# Altium PCB Power_vac.PcbDoc (part 5 of 5)
Units mm, origin at the board's own origin, x right, y up, seen from the top; angles counter-clockwise.
Board outline 180 x 212 mm, 4 copper layers (Top Layer, Int1 (GND), Int2 (PWR), Bottom Layer), stack 2.01 mm thick; 296 components, 149 nets, 798 pads, 522 vias.
Unrouted connection lines stored in the file: 1.
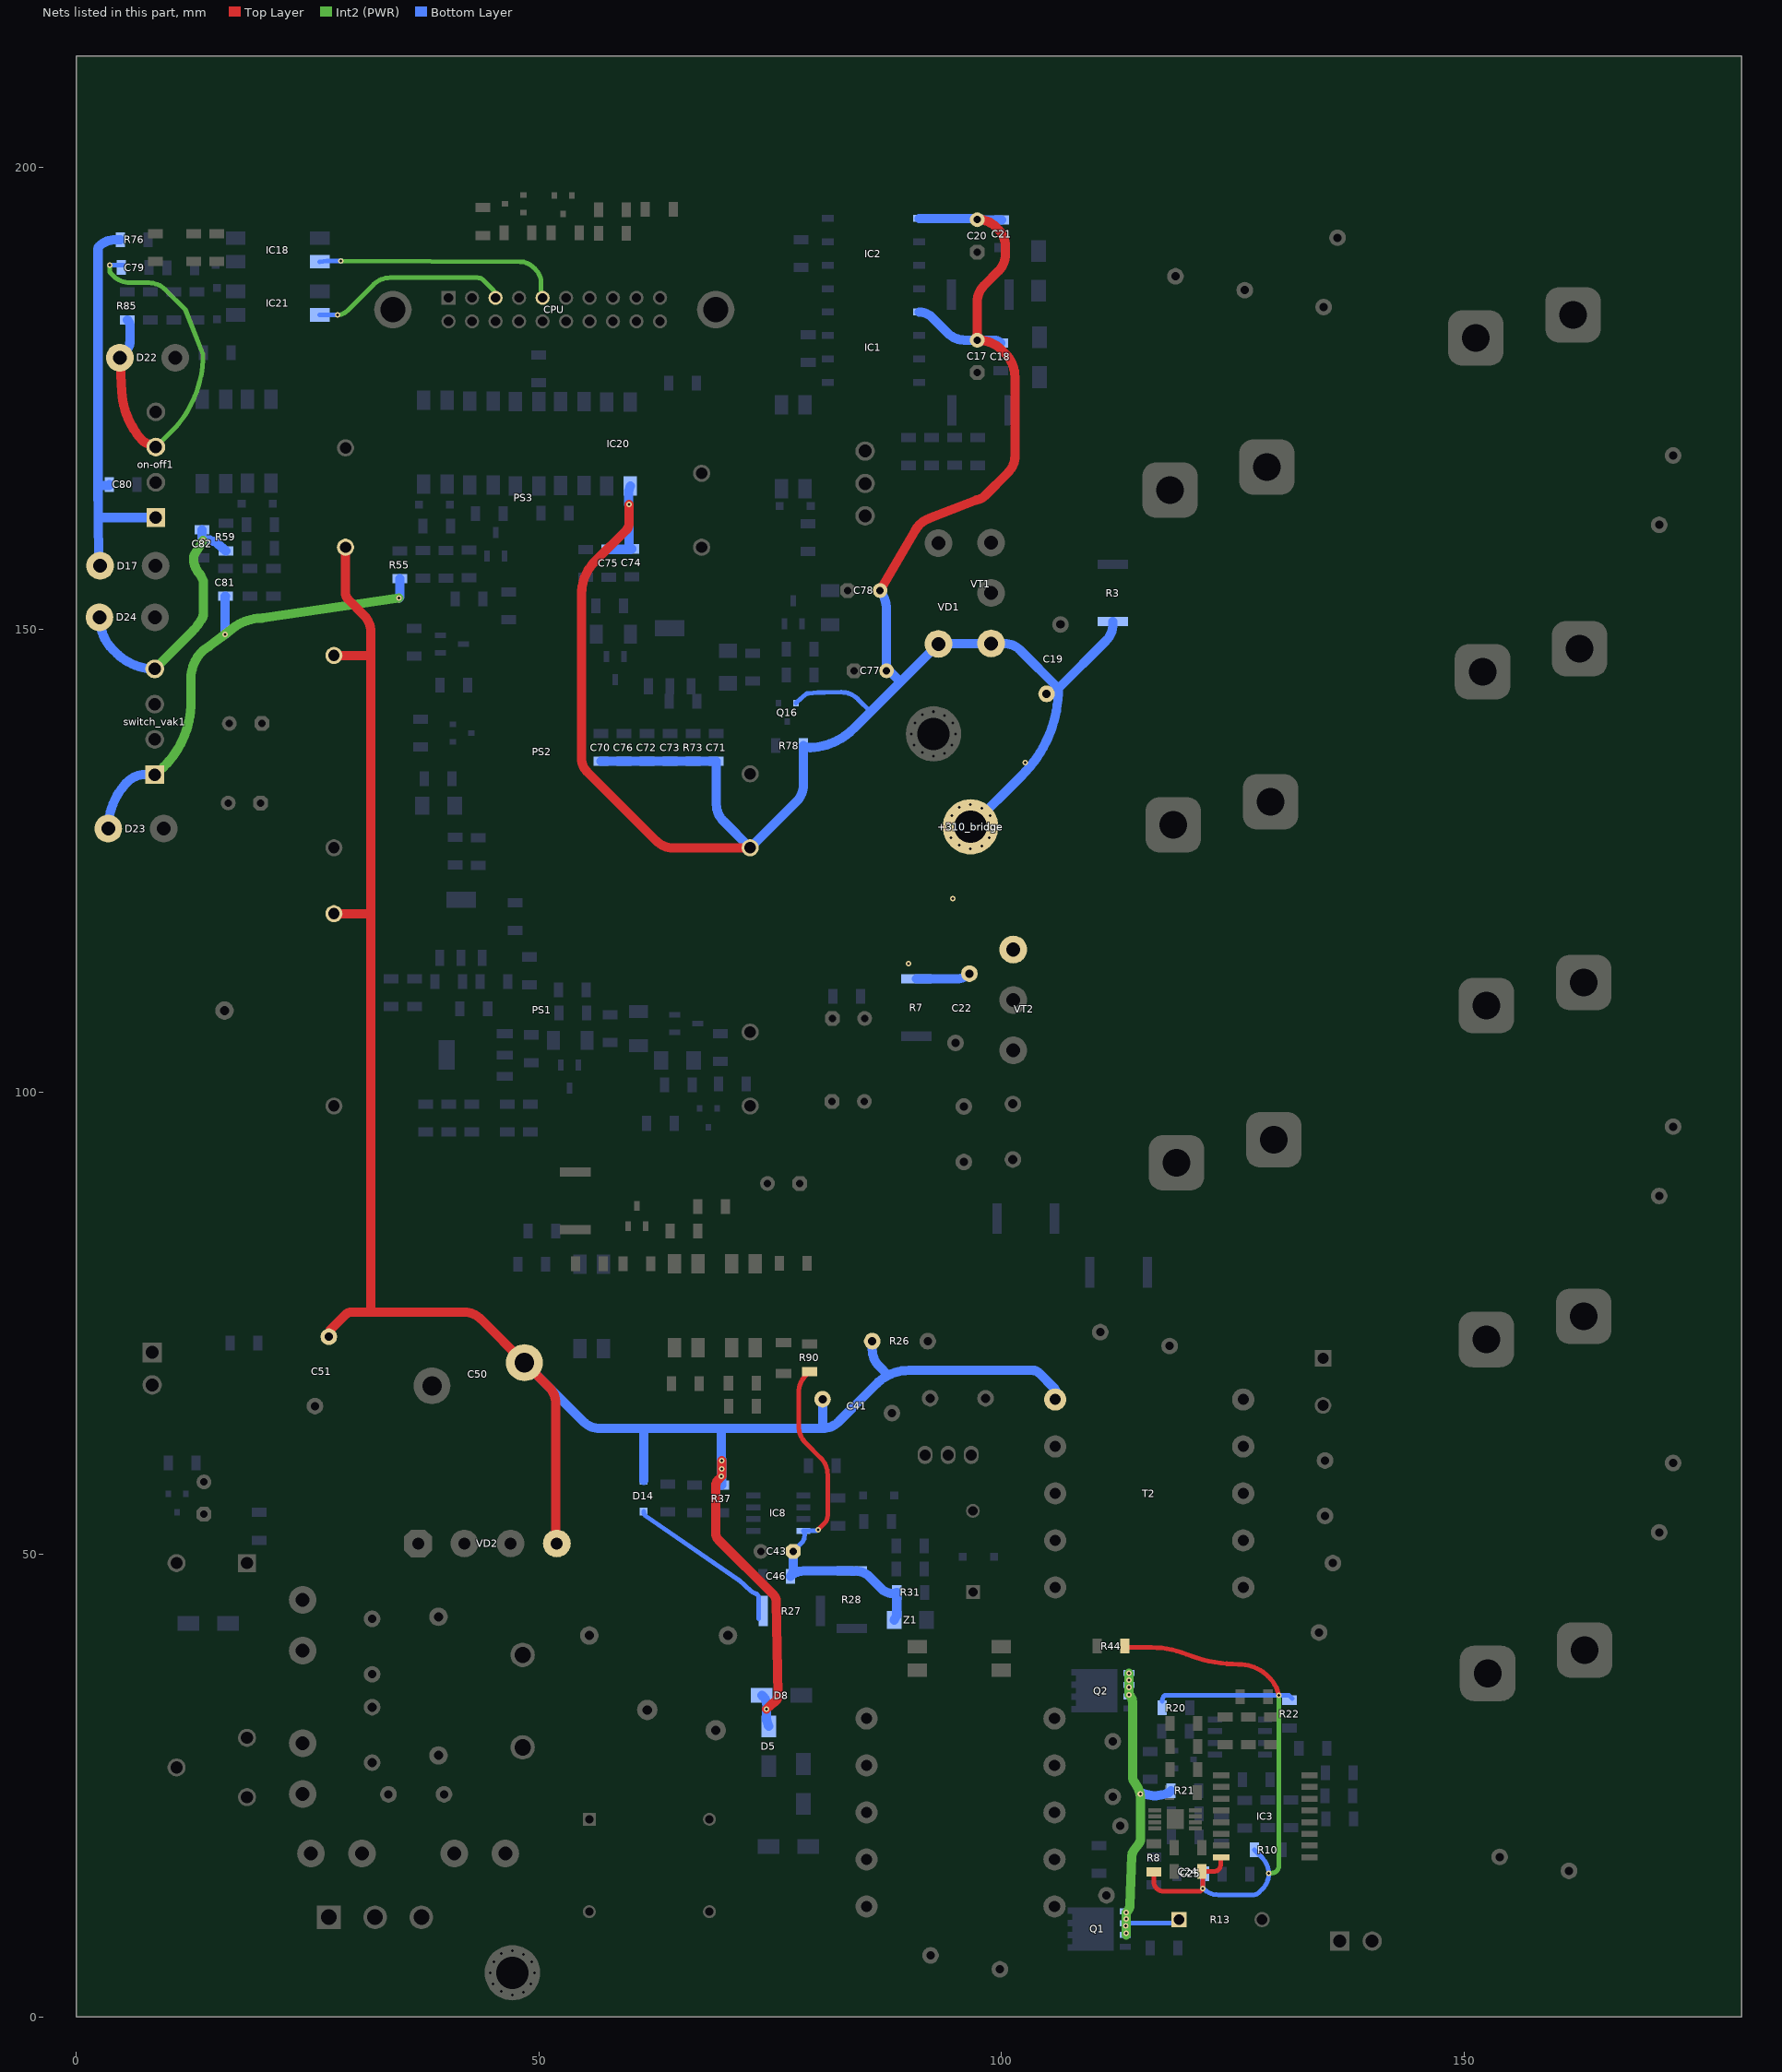
[diagram p6: the nets of this part, all layers, seen from the top]

## Via types
v1: diameter 0.6/0.6/0.6/0.6 (per signal layer), hole 0.3, Top Layer to Bottom Layer, tented both sides, 277 vias
v2: diameter 0.6, hole 0.3, Top Layer to Bottom Layer, tented both sides, 239 vias
v3: diameter 1.27, hole 0.711, Top Layer to Bottom Layer, 6 vias

## Nets (pads, with @x,y where several pads share a name; then routed paths per layer and width w, separated by ;. In a path a pad name is that pad's centre, name@x,y a point inside that pad or via, vN(x,y) a via of type N, cw(c..) or ccw(c..) an arc to the next point about the centre after c; other vN are vias at no path point) (continued)
Out_310_to_bridge: +310_bridge.1 C17.2 C18.1 C19.1 C20.2 C21.1 C22.1 C70.1 C71.1 C72.1 C73.1 C74.1 C75.1 C76.1 C77.2 C78.2 IC1.5 IC2.5 IC20.3 PS2.3 Q16.2 R3.1 R7.1 R73.1 R78.1 VD1.2 VT1.3 VT2.3 | length 257
  Top Layer w1: v2(59.75,163.55) 59.75,161.535 cw(c58.64,161.535) 59.425,160.75 56.122,157.447 cw(c55.417,158.156) 56.112,157.438 ccw(c59.517,153.902) 54.626,154.317 cw(c53.629,154.402) 54.614,154.229 ccw(c55.6,154.06) 54.6,154.062 54.6,154.06 54.6,136.065 ccw(c56.628,136.065) 55.194,134.631 62.681,127.144 ccw(c64.477,128.94) 64.477,126.4 PS2.3@72.825,126.4 ; C78.2@86.875,154.225 90.715,160.789 cw(c93.175,159.35) 92.14,162.006 97.224,163.987 cw(c97.587,163.055) 97.385,164.034 ccw(c97.067,165.596) 97.389,164.035 ccw(c97.067,165.596) 98.194,164.469 100.706,166.981 ccw(c98.91,168.777) 101.45,168.777 101.45,177.321 101.45,177.324 ccw(c97.884,177.323) 100.406,179.844 99.968,180.282 ccw(c97.509,177.823) 97.399,181.299 cw(c97.369,182.299) C17.2@97.375,181.3 ; C17.2@97.375,181.3 97.375,185.423 cw(c99.915,185.423) 98.119,187.219 99.681,188.781 ccw(c97.885,190.577) 100.425,190.577 100.425,191.448 ccw(c97.885,191.448) 99.681,193.244 99.344,193.581 ccw(c97.548,191.785) 97.548,194.325 C20.2@97.375,194.325
  Bottom Layer w0.5: Q16.2@77.8,142.05 77.85,142.15 78.875,143.025 78.93,143.052 cw(c79.153,142.605) 79.107,143.103 80.127,143.198 cw(c80.174,142.7) 80.174,143.2 80.225,143.2 ccw(c80.225,144.3) 80.237,143.2 ccw(c80.225,144.3) 80.24,143.2 80.86,143.208 82.667,143.23 cw(c82.671,142.73) 82.672,143.23 cw(c82.668,140.69) 84.464,142.486 85.837,141.113 ; C20.2@97.375,194.325 C20.2@97.388,194.313 ; C21.1@100.012,194.313 C21.1@100.025,194.3
  Bottom Layer w1: C70.1@56.675,135.75 C76.1@59.175,135.75 C72.1@61.676,135.75 C73.1@64.176,135.75 R73.1@66.676,135.75 C71.1@69.176,135.75 69.176,131.101 ccw(c71.716,131.101) 69.92,129.305 PS2.3@72.825,126.4 77.831,131.406 ccw(c76.035,133.202) 78.575,133.202 R78.1@78.575,137.45 78.908,137.312 ccw(c79.289,138.237) 79.319,137.237 ccw(c79.097,144.14) 83.983,139.258 85.837,141.113 89.012,144.288 ; C75.1@57.525,158.675 59.904,158.675 ccw(c59.904,158.846) C74.1@60.025,158.725 ; v2@59.7,163.55 59.7,164.975 IC20.3@59.871,165.525 ; C74.1@59.75,158.889 v2(59.75,163.55) ; C78.2@86.875,154.225 86.878,154.222 cw(c84.075,152.125) 87.575,152.133 C77.2@87.575,145.825 ; C77.2@87.575,145.55 C77.2@87.575,145.825 ; R7.1@90.8,112.225 91.95,112.225 95.137,112.225 ccw(c95.137,114.188) C22.1@96.525,112.8 ccw(c96.223,113.102) C22.1@96.65,113.102 ; IC1.5@91.1,184.335 cw(c91.1,182.367) 92.491,183.759 94.206,182.044 ccw(c96.002,183.84) 96.002,181.3 C17.2@97.375,181.3 99.186,181.3 cw(c99.186,180.3) 99.895,181.005 C18.1@99.9,181 ; IC2.5@91.1,194.46 97.049,194.46 cw(c97.049,193.999) C20.2@97.375,194.325 ; +310_bridge.1@96.65,128.675 102.278,134.303 ccw(c92.932,143.65) 106.15,143.65 ; C20.2@97.388,194.313 C21.1@100.012,194.313 ; R3.1@112.05,150.85 112.05,150.602 cw(c109.51,150.602) 111.306,148.806 106.15,143.65 ; C77.2@87.575,145.825 88.942,144.458 cw(c88.771,144.288) 89.012,144.288 ; 89.012,144.288 VD1.2@93.175,148.45 cw(c93.295,148.329) 93.295,148.5 VT1.3@98.875,148.5 100.248,148.5 cw(c100.248,145.96) 102.044,147.756 106.15,143.65
  other v2: 89.925,113.9 94.75,120.9 102.575,135.6
power_6565: D14.1 R27.1 | length 18
  Bottom Layer w0.5: D14.1@61.325,54.625 61.338,54.45 ccw(c61.825,54.564) 61.54,54.154 71.556,47.239 cw(c71.272,46.827) 71.605,47.2 72.942,46.005 ccw(c73.675,46.825) 73.384,45.764 cw(c73.25,45.282) 73.75,45.283 73.75,44.45 R27.1@73.75,43.05
Power_trans: C41.1 C50.1 C51.1 D5.1 D8.1 D14.2 PS1.1 PS2.1 PS3.1 R26.2 R37.1 T2.1 VD2.3 | length 254.7
  Top Layer w1: C51.1@27.275,73.525 cw(c28.26,73.696) 27.551,74.401 29.033,75.883 cw(c29.739,75.175) 29.139,75.975 cw(c29.739,75.175) 29.739,76.175 31.8,76.175 ; PS1.1@27.825,119.275 31.559,119.275 ccw(c31.559,119.616) 31.8,119.375 ; PS2.1@27.825,147.2 31.74,147.2 ccw(c31.74,147.285) 31.8,147.225 ; PS3.1@29.075,158.9 29.075,153.962 ccw(c30.075,153.964) 29.366,153.259 29.368,153.257 31.074,151.551 cw(c29.32,149.798) 31.075,151.55 cw(c29.32,149.798) 31.8,149.798 31.8,147.225 ; VD2.3@51.825,51.175 51.825,66.273 ccw(c49.285,66.273) 51.081,68.069 C50.1@48.425,70.725 43.719,75.431 ccw(c41.923,73.635) 41.923,76.175 31.8,76.175 ; v2(69.725,58.425) 69.392,58.092 ccw(c70.1,57.386) 69.1,57.386 69.1,52.286 ccw(c70.1,52.289) 69.391,51.584 75.358,45.617 75.359,45.616 cw(c74.651,44.91) 75.65,44.929 75.842,34.808 cw(c74.842,34.792) 75.329,33.919 ccw(c75.857,32.964) 75.085,33.735 v2(74.6,33.25) ; v2@69.775,58.425 v2(69.775,60.15) ; 31.8,76.175 31.8,119.375 ; 31.8,119.375 31.8,147.225
  Bottom Layer w1: C50.1@48.425,70.725 54.806,64.344 ccw(c56.602,66.14) 56.602,63.6 61.25,63.6 ; D14.2@61.325,57.975 61.325,63.419 ccw(c61.069,63.419) 61.25,63.6 ; R37.1@69.75,57.5 69.75,58.425 v2(69.75,59.225) v2@69.75,60.15 ; v2(69.775,60.15) cw(c70.691,60.552) 69.691,60.549 69.691,63.6 ; D8.1@74.075,34.75 74.411,34.45 74.601,33.909 cw(c73.656,33.58) v2(74.6,33.25) 74.6,32.075 D5.1@74.825,31.4 ; C41.1@80.65,66.775 80.65,63.726 cw(c80.472,63.726) 80.598,63.6 ; R26.2@86.025,73.05 86.025,72.144 ccw(c88.565,72.144) 86.769,70.348 87.758,69.36 ; T2.1@105.93,66.742 105.93,67.331 ccw(c104.93,67.331) 105.637,68.038 104.078,69.597 ccw(c103.371,68.89) 103.971,69.69 ccw(c103.371,68.89) 103.371,69.89 89.982,69.89 ccw(c89.982,64.96) 87.758,69.36 ; 61.25,63.6 61.325,63.6 69.691,63.6 ; 69.691,63.6 80.598,63.6 ; 80.598,63.6 ccw(c80.598,66.14) 82.394,64.344 85.457,67.407 86.496,68.446 cw(c89.982,64.96) 87.758,69.36
Rele_off_connect: C80.2 D17.2 on-off1.1 R76.1 | length 44.7
  Bottom Layer w1: 2.319,165.621 2.354,162.112 2.355,161.995 2.356,161.974 ; D17.2@2.55,156.9 ccw(c1.561,157.045) 2.561,157.045 ccw(c1.561,157.045) 2.482,157.434 2.476,157.448 cw(c3.398,157.836) 2.398,157.825 2.356,161.974 ; C80.2@3.525,165.7 3.525,165.601 2.319,165.601 2.319,191.169 cw(c2.681,191.169) 2.425,191.425 2.431,191.431 cw(c4.227,189.635) 4.227,192.175 R76.1@4.75,192.175 ; on-off1.1@8.575,162.115 2.695,162.115 ccw(c2.695,161.635) 2.356,161.974
Rele_on_connect: C79.2 D22.2 on-off1.3 R85.1 | length 44.4
  Top Layer w1: D22.2@4.675,179.4 4.892,175.712 ccw(c13.413,176.214) 7.117,170.451 ccw(c7.852,171.129) 7.479,170.201 8.568,169.76 cw(c8.19,168.833) on-off1.3@8.582,169.753
  Int2 (PWR) w0.5: v2(3.6,189.4) 3.6,188.766 ccw(c3.941,188.766) 3.7,188.525 3.981,188.244 ccw(c5.777,190.04) 5.777,187.5 7.806,187.5 cw(c7.806,184.96) 9.602,186.756 11.761,184.597 13.64,179.839 cw(c13.175,179.654) 13.675,179.654 cw(c1.734,179.746) 10.708,171.868 10.697,171.857 on-off1.3@8.575,169.735
  Bottom Layer w0.5: v2(3.6,189.4) C79.2@5.05,189.4
  Bottom Layer w1: D22.2@4.675,179.4 5.281,180.006 ccw(c4.089,181.199) 5.775,181.199 5.775,182.786 ccw(c4.775,182.786) 5.48,183.495 R85.1@5.475,183.5
switch__vak_2: C82.1 D24.2 R59.1 switch_vak1.4 | length 29.3
  Int2 (PWR) w1: switch_vak1.4@8.45,145.745 12.611,149.906 ccw(c9.314,153.207) 13.401,150.957 ccw(c12.679,151.679) 13.7,151.679 13.7,155.25 13.461,155.781 ccw(c12.549,155.37) 13.296,156.034 cw(c15.19,157.727) 12.652,157.632 cw(c15.19,157.727) 12.652,157.636 cw(c13.651,157.669) 12.798,158.192 v2(13.676,159.625)
  Bottom Layer w1: D24.2@2.575,151.05 ccw(c7.102,151.05) 3.901,147.849 3.903,147.847 4.279,147.471 ccw(c8.45,151.648) switch_vak1.4@8.45,145.745 ; C82.1@13.575,160.775 13.575,159.869 ccw(c13.92,159.869) v2(13.676,159.625) 13.727,159.646 cw(c14.108,158.722) 14.393,159.68 14.396,159.679 14.763,159.568 cw(c14.375,158.275) 15.275,159.281 16.149,158.5 R59.1@16.152,158.5
switch_vak_1: C81.2 D23.2 R55.1 switch_vak1.1 | length 52.4
  Int2 (PWR) w1: switch_vak1.1@8.45,134.315 8.962,134.731 ccw(c2.451,142.22) 12.375,142.202 12.375,142.205 12.375,144.719 12.375,144.722 cw(c16.534,144.72) 13.621,147.688 cw(c16.534,144.72) 13.631,147.697 13.639,147.705 cw(c14.321,146.974) 13.76,147.802 14.328,148.185 ccw(c13.767,149.013) 14.369,148.214 v2(16.075,149.5) 17.136,150.321 ccw(c16.524,151.112) 17.138,150.323 cw(c17.752,149.533) 17.197,150.365 cw(c20.045,146.078) 17.199,150.367 cw(c20.045,146.078) 19.918,151.223 cw(c20.045,146.078) 19.921,151.224 ccw(c19.894,152.223) 20.125,151.25 ccw(c19.894,152.223) 20.126,151.25 cw(c20.355,150.277) 20.209,151.266 v2(34.85,153.4)
  Bottom Layer w1: D23.2@3.425,128.475 cw(c10.607,128.475) 5.436,133.459 cw(c10.607,128.475) 5.528,133.553 cw(c7.37,131.708) 7.37,134.315 switch_vak1.1@8.45,134.315 ; v2(16.075,149.5) 16.075,153.6 C81.2@16.1,153.6 ; v2(34.85,153.4) ccw(c34.609,153.641) 34.95,153.641 R55.1@34.95,155.496
U_shunt: Q1.1 Q1.2 Q1.3 Q2.1 Q2.2 Q2.3 R13.1 R21.1 | length 43.6
  Int2 (PWR) w1: v2@113.5,8.837 v2(113.5,9.025) 113.491,9.802 113.483,10.556 v2(113.475,11.275) 113.576,11.369 ccw(c112.895,12.101) 113.895,12.064 114.094,17.398 cw(c115.094,17.358) 114.294,17.958 114.826,18.668 ccw(c114.025,19.267) 115.025,19.267 115.025,23.523 ccw(c112.158,23.523) 114.401,25.308 ccw(c112.158,23.523) 114.4,25.31 cw(c115.184,25.931) 114.184,25.925 114.157,34.033 ccw(c113.157,34.03) 113.861,34.739 v2(113.775,34.825) v2(113.775,35.625) v2(113.775,36.4) v2(113.775,37.155)
  Bottom Layer w0.35: Q1.3@113.375,8.84 v2(113.5,9.025) ; Q1.3@113.375,9.056 v2(113.5,9.025) ; v2(113.475,11.275) Q1.1@113.375,11.38 113.375,10.55 Q1.2@113.375,10.11 ; Q1.2@113.8,10.11 Q1.2@113.375,10.11 ; Q1.2@113.375,10.11 113.417,9.96 113.417,9.762 ccw(c113.767,9.762) 113.419,9.725 113.484,9.098 ccw(c113.833,9.134) v2(113.5,9.025)
  Bottom Layer w0.5: v2(113.775,34.825) v2(113.775,35.625) v2(113.775,37.155) ; Q1.2@113.8,10.11 118.376,10.11 ccw(c118.376,10.46) 118.503,10.134 118.524,10.142 R13.1@119.175,10.5
  Bottom Layer w1: v2(115,24.075) cw(c115.288,23.117) 115.637,24.054 ccw(c116.584,26.574) 117.26,23.969 117.801,24.11 ccw(c117.546,25.077) R21.1@118.325,24.45
  other v2: 113.45,9.8 113.475,10.55
Vac_off: CPU.9 IC18.4 | length 26.6
  Int2 (PWR) w0.5: v2@28.715,189.874 47.945,189.776 cw(c47.984,187.923) 49.267,189.26 ; 49.324,189.213 cw(c48.099,187.475) 50.22,187.625 CPU.9@50.22,186.262
  Bottom Layer w0.5: IC18.4@26.3,189.78 27.1,189.875 v2(28.55,189.875) ; CPU.9@50.22,186.262 ccw(c50.767,186.262) CPU.9@50.38,185.875
Vac_on: CPU.5 IC21.4 | length 21.6
  Int2 (PWR) w0.5: v2@28.232,184.03 ccw(c28.195,185.563) 29.279,184.479 32.106,187.306 cw(c33.902,185.51) 33.902,188.05 43.336,188.05 cw(c43.336,187.111) 44,187.775 44.876,186.899 cw(c43.851,185.875) CPU.5@45.3,185.875
  Bottom Layer w0.5: IC21.4@26.3,184.03 28.195,184.03 28.197,184.028 cw(c28.242,183.531) v2@28.232,184.03
  other v2: 28.2,184.025
vcc_6565: C43.1 C46.2 IC8.8 R28.2 R31.1 R90.2 Z1.1 | length 41.6
  Top Layer w0.5: R90.2@79.25,69.75 78.819,69.319 ccw(c80.615,67.523) 78.075,67.523 78.075,63.852 ccw(c80.615,63.852) 78.819,62.056 80.456,60.419 cw(c78.66,58.623) 81.2,58.623 81.2,54.175 cw(c80.053,54.175) 80.864,53.364 v2(80.175,52.675)
  Bottom Layer w0.5: C43.1@77.475,50.325 78.425,51.275 ccw(c77.794,51.906) 78.681,51.815 78.71,52.097 ccw(c78.213,52.148) 78.673,52.344 78.619,52.47 IC8.8@78.587,52.545 79.861,52.545 ccw(c79.861,52.989) v2(80.175,52.675)
  Bottom Layer w1: C43.1@77.475,50.325 77.475,48.349 cw(c76.451,48.349) C46.2@77.175,47.625 cw(c78.563,46.237) 78.563,48.2 R28.2@83.825,48.2 ; R28.2@83.834,48.153 cw(c84.238,46.092) 85.723,47.577 87.002,46.298 ccw(c88.351,47.651) 88.011,45.771 ccw(c88.187,46.755) 88.57,45.832 R31.1@88.675,45.875 88.675,43.38 Z1.1@88.4,42.9
Vref: C24.2 C25.1 IC3.16 R8.2 R10.1 R20.2 R22.1 R44.2 | length 78.7
  Top Layer w0.5: R44.2@113.35,40.125 113.6,39.925 116.238,39.925 cw(c116.24,29.897) 119.957,39.211 ccw(c125.686,53.545) 125.619,38.108 ccw(c125.686,53.545) 125.62,38.108 cw(c125.626,33.539) 129.472,36.006 129.688,35.67 cw(c129.311,35.425) 129.742,35.554 v2(129.975,34.775) ; R8.2@116.475,15.675 116.475,14.6 ccw(c117.525,14.6) 117.525,13.55 121.313,13.55 121.314,13.55 ccw(c121.313,14.05) v2(121.778,13.868) 121.778,15.597 ccw(c121.675,15.597) C24.2@121.675,15.7 122.95,15.7 ccw(c122.95,16.45) 123.7,16.45 123.7,17.155 IC3.16@123.75,17.23
  Int2 (PWR) w0.5: v2(128.9,15.525) 129.2,15.525 ccw(c129.2,16.3) 129.975,16.3 v2(129.975,34.775)
  Bottom Layer w0.5: R20.2@117.375,34.125 cw(c118.28,34.125) 117.508,34.598 cw(c118.28,34.125) 117.509,34.6 cw(c117.807,34.415) 117.806,34.765 131.068,34.765 R22.1@131.45,34.383 ; C25.1@121.95,15.475 121.778,14.925 121.778,14.09 ccw(c122.278,14.09) 121.962,13.703 ccw(c123.452,15.542) 123.452,13.175 123.454,13.175 127.151,13.175 ccw(c127.151,14.199) 127.875,13.475 128.221,13.821 ccw(c126.642,15.4) v2@128.875,15.4 ; R10.1@127.325,18.05 128.131,17.244 cw(c126.335,15.448) v2@128.875,15.448
pads on no net: Ban. IC1.1 IC1.4 IC2.1 IC2.4 IC3.4 IC5.7 K1.5 T1.8 T2.8 VD1. VT1. VT2.

## Polygon pours and split planes (outlines as drawn)
310v on Bottom Layer "NONET_L01_P-001" (solid, pour order 108): 21 vertices, not listed, extent 115.075,78.425 130.775,88.475
Out_310_to_bridge on Bottom Layer "NONET_L01_P-001" (solid, pour order 107): 22 vertices, not listed, extent 106.475,141.72 114.575,151.75
NetC19_2 on Bottom Layer "NONET_L01_P-001" (solid, pour order 106): 49 vertices, not listed, extent 96.85,149.525 114.8,175.675
NetR46_2 on Bottom Layer "NONET_L01_P-001" (solid, pour order 105): 34 vertices, not listed, extent 40.2,31.475 64.025,57.95
NetD10_1 on Bottom Layer "NONET_L01_P-001" (solid, pour order 95): 37 vertices, not listed, extent 93.45,59.925 107.575,67.85
NetD3_1 on Bottom Layer "NONET_L01_P-001" (solid, pour order 93): 94.675,93.55 cw(c95.701,92.524) 95.701,93.975 100.52,93.975 cw(c100.52,91.67) 102.15,93.3 cw(c101.788,92.938) 102.3,92.938 102.3,92.05 cw(c101.817,92.05) 102.159,91.709 101.7,91.25 cw(c100.372,92.578) 100.372,90.7 95.725,90.7 cw(c95.725,91.847) 94.914,91.036 94.475,91.475 cw(c94.596,91.596) 94.425,91.596 94.425,92.85
NetD3_2 on Bottom Layer "NONET_L01_P-001" (solid, pour order 91): 30 vertices, not listed, extent 99.225,97.675 107.575,112
Out_310_to_bridge on Bottom Layer "NONET_L01_P-001" (solid, pour order 88): 35 vertices, not listed, extent 88.425,110.925 104.375,132.425
Out_310_to_bridge on Bottom Layer "NONET_L01_P-001" (solid, pour order 87): 35 vertices, not listed, extent 91,124.875 107.775,150.825
NetD13_2 on Bottom Layer "NONET_L01_P-001" (solid, pour order 84): 29.75,27.295 29.75,27.645 cw(c30.925,27.645) 30.925,28.82 32.785,28.82 cw(c32.785,26.28) 35.325,26.28 35.325,23.17 cw(c34.375,23.17) 34.375,22.22 31.525,22.22 cw(c31.525,23.745) 30,23.745
NetC49_1 on Bottom Layer "NONET_L01_P-001" (solid, pour order 81): 19 vertices, not listed, extent 67.038,20.438 71.688,42.513
NetD7_1 on Bottom Layer "NONET_L01_P-001" (solid, pour order 77): 77.2,35.525 cw(c77.6,35.525) 77.6,35.925 85.875,35.925 cw(c85.875,34.2) 87.6,34.2 87.6,26.475 cw(c86.075,26.675) 85.875,25.15 78.225,25.15 cw(c78.177,26.127) 77.2,26.075
NetD5_2 on Bottom Layer "NONET_L01_P-001" (solid, pour order 76): 83.075,17.3 cw(c84.6,17.3) 84.6,18.825 86.875,18.825 cw(c86.875,18.8) 86.9,18.8 cw(c86.9,17.85) 87.85,17.85 87.85,11.05 cw(c87.8,11.05) 87.8,11 cw(c86.775,11) 86.775,9.975 84.975,9.975 cw(c84.975,11.875) 83.075,11.875
GND_akum on Bottom Layer "NONET_L01_P-001" (solid, pour order 75): 25 vertices, not listed, extent 98.555,2.846 138.78,37.571
NetD9_2 on Bottom Layer "NONET_L01_P-001" (solid, pour order 73): 18 vertices, not listed, extent 123.675,57.925 136.625,68.175
GND_digit on Bottom Layer "NONET_L01_P-001" (solid, pour order 65): 46 vertices, not listed, extent 15.65,173.29 82.4,208.415
NetFU2_1 on Bottom Layer "NONET_L01_P-001" (solid, pour order 60): 22 vertices, not listed, extent 17.124,22.083 27.124,32.133
GND_N on Bottom Layer "NONET_L01_P-001" (solid, pour order 59): 35.107,50.18 35.107,67.496 cw(c37.241,67.496) 35.732,69.005 36.663,69.936 cw(c38.459,68.14) 38.459,70.68 39.318,70.68 cw(c39.319,68.717) 40.707,70.105 cw(c39.439,68.838) 41.232,68.838 41.232,67.182 cw(c38.692,67.182) 40.488,65.386 39.651,64.549 ccw(c41.447,62.753) 38.907,62.753 38.907,50.34 cw(c36.99,50.664)
220_L on Bottom Layer "NONET_L01_P-001" (solid, pour order 58): 40 vertices, not listed, extent 8.85,9.25 32.5,28.8
220_L_Fuse on Bottom Layer "NONET_L01_P-001" (solid, pour order 57): 19 vertices, not listed, extent 38.238,15.8 56.363,32
220_N on Bottom Layer "NONET_L01_P-001" (solid, pour order 53): 37 vertices, not listed, extent 31.056,9.069 63.581,44.894
GND_force on Bottom Layer "NONET_L01_P-001" (solid, pour order 38): 17 vertices, not listed, extent 114.375,160.85 121.1,173.35
GND_force on Bottom Layer "NONET_L01_P-001" (solid, pour order 37): 22 vertices, not listed, extent 113.15,87.8 122.3,132.875
GND_force on Bottom Layer "NONET_L01_P-001" (solid, pour order 35): 35 vertices, not listed, extent 158.525,32.575 176.325,189.425
310v on Bottom Layer "Bottom Layer-310v" (solid, pour order 34): 43 vertices, not listed, extent 123.673,33.001 155.873,189.251
NetC93_2 on Bottom Layer "NONET_L01_P-001" (solid, pour order 18): 18 vertices, not listed, extent 133.65,47.35 137.525,55.25
GND_force on Bottom Layer "NONET_L01_P-001" (solid, pour order 17): 124.275,48.595 124.275,51.266 cw(c125.663,51.266) 124.682,52.248 124.842,52.408 cw(c126.25,50.999) 126.25,52.991 127.04,52.991 cw(c127.04,51.882) 127.825,52.666 cw(c126.316,51.157) 128.45,51.157 128.45,46.95 cw(c126.316,46.95) 127.825,45.441 127.794,45.41 cw(c125.998,47.206) 125.998,44.666 125.7,44.666 124.466,45.9 cw(c124.808,46.241) 124.325,46.241
U_shunt on Bottom Layer "NONET_L01_P-001" (solid, pour order 15): 113.05,37.4 cw(c113.231,37.4) 113.103,37.528 113.25,37.675 cw(c113.371,37.554) 113.371,37.725 114.204,37.725 cw(c114.204,37.554) 114.325,37.675 114.362,37.638 cw(c114.148,37.425) 114.45,37.425 114.45,34.371 cw(c114.279,34.371) 114.4,34.25 cw(c114.159,34.491) 114.159,34.15 113.618,34.15 cw(c113.618,34.918) 113.075,34.375
NetC40_2 on Bottom Layer "NONET_L01_P-001" (solid, pour order 14): 110.875,24.1 cw(c111.72,24.1) 111.122,24.697 111.175,24.75 cw(c111.899,24.026) 111.899,25.05 112.334,25.05 cw(c112.334,23.684) 113.3,24.65 cw(c111.791,23.141) 113.925,23.141 113.925,20.51 cw(c112.815,20.51) 113.6,19.725 cw(c112.634,20.691) 112.634,19.325 112.625,19.325 cw(c112.625,20.834) 111.558,19.767 111.45,19.875 cw(c112.959,21.384) 110.825,21.384 110.825,22.95
12v_akum on Bottom Layer "NONET_L01_P-001" (solid, pour order 13): 18 vertices, not listed, extent 104.15,15.45 107.3,28.525
U_shunt on Bottom Layer "NONET_L01_P-001" (solid, pour order 12): 32 vertices, not listed, extent 112.72,8.306 120.195,11.863
Drain_1 on Bottom Layer "NONET_L01_P-001" (solid, pour order 11): 29 vertices, not listed, extent 104.4,7.025 112.375,14.075
NetQ2_4 on Bottom Layer "NONET_L01_P-001" (solid, pour order 8): 23 vertices, not listed, extent 113.2,28.575 117.15,35
Drain_2 on Bottom Layer "NONET_L01_P-001" (solid, pour order 6): 32 vertices, not listed, extent 104.425,28.75 113.175,37.775
GND_akum on Int1 (GND) "NONET_L01_P-001" (solid, pour order 62): 22 vertices, not listed, extent 98.425,2.8 142.375,39.241
GND_N on Int1 (GND) "Int1 (GND)-GND_N" (solid, pour order 49): 52 vertices, not listed, extent 21.775,4.254 113.964,75.338
GND_force on Int1 (GND) "Int1 (GND)-GND_force" (solid, pour order 30): 59 vertices, not listed, extent 34.663,12.713 176.463,200.138
GND_force on Int1 (GND) "NONET_L01_P-001" (solid, pour order 19): 64 vertices, not listed, extent 5.25,40.775 24.85,199.7
310v on Top Layer "310V_L01_P115" (solid, remove dead copper, pour order 115): 159.178,169.867 158.33,169.867 cw(c158.33,172.407) 156.534,170.611 154.303,172.842 153.771,172.311 ccw(c155.567,170.515) 153.028,170.515 153.028,167.744 ccw(c156.299,167.52) 154.299,164.921 cw(c157.142,164.716) 157.142,167.567 159.153,167.567
310v on Top Layer "310V_L01_P114" (solid, remove dead copper, pour order 114): 159.928,97.342 159.08,97.342 cw(c159.08,99.882) 157.284,98.086 155.053,100.317 154.521,99.786 ccw(c156.317,97.99) 153.778,97.99 153.778,95.219 ccw(c157.049,94.995) 155.049,92.396 cw(c157.892,92.191) 157.892,95.042 159.903,95.042
310v on Top Layer "310V_L01_P113" (solid, remove dead copper, pour order 113): 159.799,60.9 158.951,60.9 cw(c158.951,63.44) 157.155,61.644 154.924,63.875 154.393,63.344 ccw(c156.189,61.548) 153.649,61.548 153.649,58.777 ccw(c156.921,58.553) 154.92,55.955 cw(c157.763,55.75) 157.763,58.6 159.774,58.6
Fod_3184_18v on Top Layer "FOD_3184_18V_L01_P112" (solid, remove dead copper, pour order 112): 19 vertices, not listed, extent 75.25,80.3 80.125,91.45
Eth on Top Layer "NONET_L01_P-001" (solid, pour order 110): 33 vertices, not listed, extent 30.773,0.85 50.898,12.05
310v on Top Layer "NONET_L01_P-001" (solid, pour order 109): 23 vertices, not listed, extent 133.375,68.325 142.8,76.85
NetC49_2 on Top Layer "NONET_L01_P-001" (solid, pour order 104): 36 vertices, not listed, extent 44.848,9.8 70.625,53.175
GND_akum on Top Layer "Top Layer-GND_akum" (solid, remove dead copper, pour order 99): 34 vertices, not listed, extent 98.425,2.825 142.95,37.55
NetD3_2 on Top Layer "NONET_L01_P-001" (solid, pour order 92): 30 vertices, not listed, extent 99.325,97.7 107.675,112.025
Out_310_to_bridge on Top Layer "NONET_L01_P-001" (solid, pour order 90): 35 vertices, not listed, extent 90.971,124.96 107.746,150.91
Out_310_to_bridge on Top Layer "NONET_L01_P-001" (solid, pour order 89): 35 vertices, not listed, extent 88.326,110.959 104.276,132.459
310v on Top Layer "NONET_L01_P-001" (solid, pour order 86): 24 vertices, not listed, extent 97.125,152.175 129.2,159.6
NetC49_1 on Top Layer "NONET_L01_P-001" (solid, pour order 82): 19 vertices, not listed, extent 67.054,20.471 71.704,42.546
12v_akum on Top Layer "NONET_L01_P-001" (solid, pour order 80): 18 vertices, not listed, extent 104.088,15.412 107.237,28.487
GND_digit on Top Layer "NONET_L01_P-001" (solid, pour order 66): 44 vertices, not listed, extent 15.736,173.275 82.486,208.4
GND_N on Top Layer "NONET_L01_P-001" (solid, pour order 44): 35.11,50.384 35.11,67.7 cw(c37.244,67.7) 35.735,69.209 36.666,70.14 cw(c38.462,68.344) 38.462,70.884 39.322,70.884 cw(c39.322,68.921) 40.71,70.309 cw(c39.443,69.041) 41.235,69.041 41.235,67.386 cw(c38.696,67.386) 40.491,65.59 39.654,64.753 ccw(c41.45,62.957) 38.91,62.957 38.91,50.543 cw(c36.993,50.867)
310v on Top Layer "Top Layer-310v" (solid, pour order 33): 43 vertices, not listed, extent 123.825,32.975 156.025,189.225
310v on Int2 (PWR) "NONET_L01_P-001" (solid, pour order 103): 24 vertices, not listed, extent 97.096,152.17 129.171,159.595
GND_force on Int2 (PWR) "NONET_L01_P-001" (solid, pour order 101): 124.225,48.6 124.225,51.271 cw(c125.613,51.271) 124.632,52.253 124.792,52.413 cw(c126.2,51.005) 126.2,52.996 126.99,52.996 cw(c126.99,51.887) 127.775,52.671 cw(c126.266,51.163) 128.4,51.163 128.4,46.955 cw(c126.266,46.955) 127.775,45.446 127.744,45.415 cw(c125.948,47.211) 125.948,44.671 125.65,44.671 124.416,45.905 cw(c124.758,46.246) 124.275,46.246
NetC93_2 on Int2 (PWR) "NONET_L01_P-001" (solid, pour order 100): 18 vertices, not listed, extent 133.6,47.386 137.475,55.286
NetD10_1 on Int2 (PWR) "NONET_L01_P-001" (solid, pour order 96): 37 vertices, not listed, extent 93.441,59.925 107.566,67.85
NetD9_2 on Int2 (PWR) "NONET_L01_P-001" (solid, pour order 94): 17 vertices, not listed, extent 123.634,57.941 136.584,68.191
NetD13_2 on Int2 (PWR) "NONET_L01_P-001" (solid, pour order 83): 29.7,27.35 29.7,27.7 cw(c30.875,27.7) 30.875,28.875 32.735,28.875 cw(c32.735,26.335) 35.275,26.335 35.275,23.225 cw(c34.325,23.225) 34.325,22.275 31.475,22.275 cw(c31.475,23.8) 29.95,23.8
NetD5_2 on Int2 (PWR) "NONET_L01_P-001" (solid, pour order 79): 83.075,17.325 cw(c84.6,17.325) 84.6,18.85 86.875,18.85 cw(c86.875,18.825) 86.9,18.825 cw(c86.9,17.875) 87.85,17.875 87.85,11.075 cw(c87.8,11.075) 87.8,11.025 cw(c86.775,11.025) 86.775,10 84.975,10 cw(c84.975,11.9) 83.075,11.9
NetD7_1 on Int2 (PWR) "NONET_L01_P-001" (solid, pour order 78): 77.225,35.512 cw(c77.625,35.512) 77.625,35.912 85.9,35.912 cw(c85.9,34.188) 87.625,34.187 87.625,26.462 cw(c86.1,26.662) 85.9,25.137 78.25,25.137 cw(c78.202,26.114) 77.225,26.062
NetFU2_1 on Int2 (PWR) "NONET_L01_P-001" (solid, pour order 56): 22 vertices, not listed, extent 17.05,22.075 27.05,32.125
220_L on Int2 (PWR) "NONET_L01_P-001" (solid, pour order 55): 40 vertices, not listed, extent 8.9,9.175 32.55,28.725
220_L_Fuse on Int2 (PWR) "NONET_L01_P-001" (solid, pour order 50): 19 vertices, not listed, extent 38.3,15.775 56.425,31.975
Eth on Int2 (PWR) "NONET_L01_P-001" (solid, pour order 45): 33 vertices, not listed, extent 30.775,1.075 50.9,12.275
GND_force on Int2 (PWR) "NONET_L01_P-001" (solid, pour order 36): 23 vertices, not listed, extent 14.901,73.3 44.375,93.725

## Keep-outs
Keep-Out Layer:
  circle w3: c109.875,186.5 r2
  circle w3: c141.703,56.881 r2
  circle w3: c109.825,111.725 r2
  circle w3: c171.953,128.35 r2
  circle w3: c98.578,76.056 r2
  circle w3: c106.778,203.981 r2
  circle w3: c76.775,8.075 r2
  circle w3: c8.053,113.881 r2
  circle w3: c171.953,8.006 r2
  circle w3: c8.053,8.006 r2
  circle w3: c171.953,203.981 r2
  circle w3: c86.5,90.35 r2
  circle w3: c24.5,90.35 r2
  circle w3: c86.5,200.35 r2
  circle w3: c24.475,200.325 r2
  circle w3: c8.05,203.981 r2

## Other copper
Bottom Layer:
  pour cut-out: 51.025,180.951 cw(c50.492,180.951) 50.869,180.574 50.695,180.4 50.819,180.4 ccw(c50.819,180.66) 51.003,180.476 ccw(c50.801,180.679) 51.087,180.679 51.087,180.8 ccw(c50.875,180.8)

## Silkscreen, mask and mechanical layers (free items; w line width, h text height)
Top Overlay:
  lines w0.1: 18.5,84.35 18.5,206.35 92.5,206.35 92.5,84.35 ; 18.675,84.35 92.675,84.35 ; 0.05,204 8.05,204 8.05,212 0.05,212 0.05,204 ; 0.053,0.006 8.053,0.006 8.053,8.006 0.053,8.006 0.053,0.006 ; 0.053,113.881 8.053,113.881 8.053,121.881 0.053,121.881 0.053,113.881 ; 171.953,0.006 179.953,0.006 179.953,8.006 171.953,8.006 171.953,0.006 ; 171.953,203.981 179.953,203.981 179.953,211.981 171.953,211.981 171.953,203.981
  lines w0.254: 49.3,89.4 49.3,92.3 70,92.3 70,89.4 ; 49.325,89.225 70.025,89.225
Mechanical 13:
  lines w0.1: 0,0 180,0 180,212 0,212 0,0
  lines w0.254: 179.95,163.075 179.975,163.05

## Text inside footprints (layer, text, board x,y; h text height)
T1: Top Overlay "1" at 103.504,9.179 h1.52; Top Overlay "5" at 102.579,33.279 h1.52; Top Overlay "10" at 87.004,9.354 h1.52; Top Overlay "6" at 87.929,33.554 h1.52
T2: Top Overlay "6" at 123.479,43.454 h1.52; Top Overlay "10" at 122.404,68.054 h1.52; Top Overlay "5" at 105.359,43.401 h1.52; Top Overlay "1" at 106.159,68.176 h1.52